# Allegro board electronic dice.brd
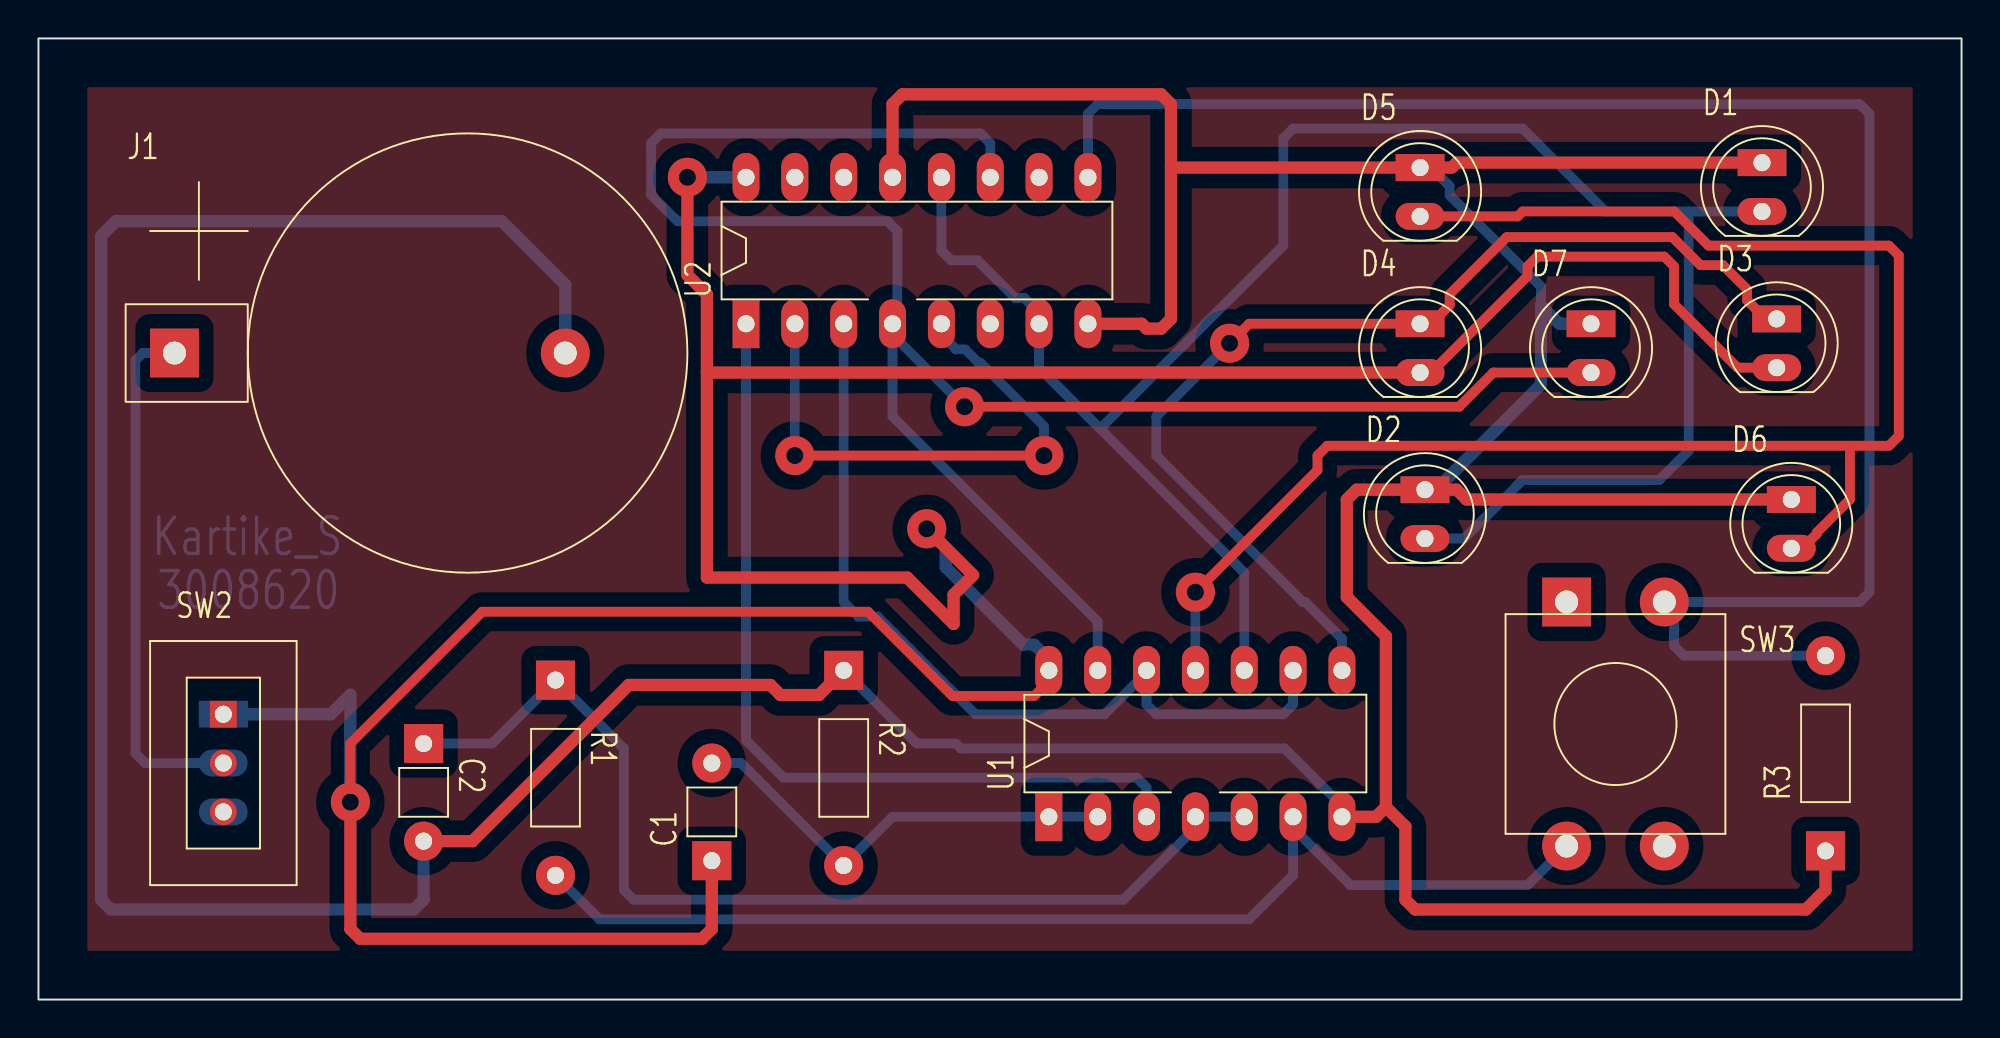
[diagram p0: board, top side]
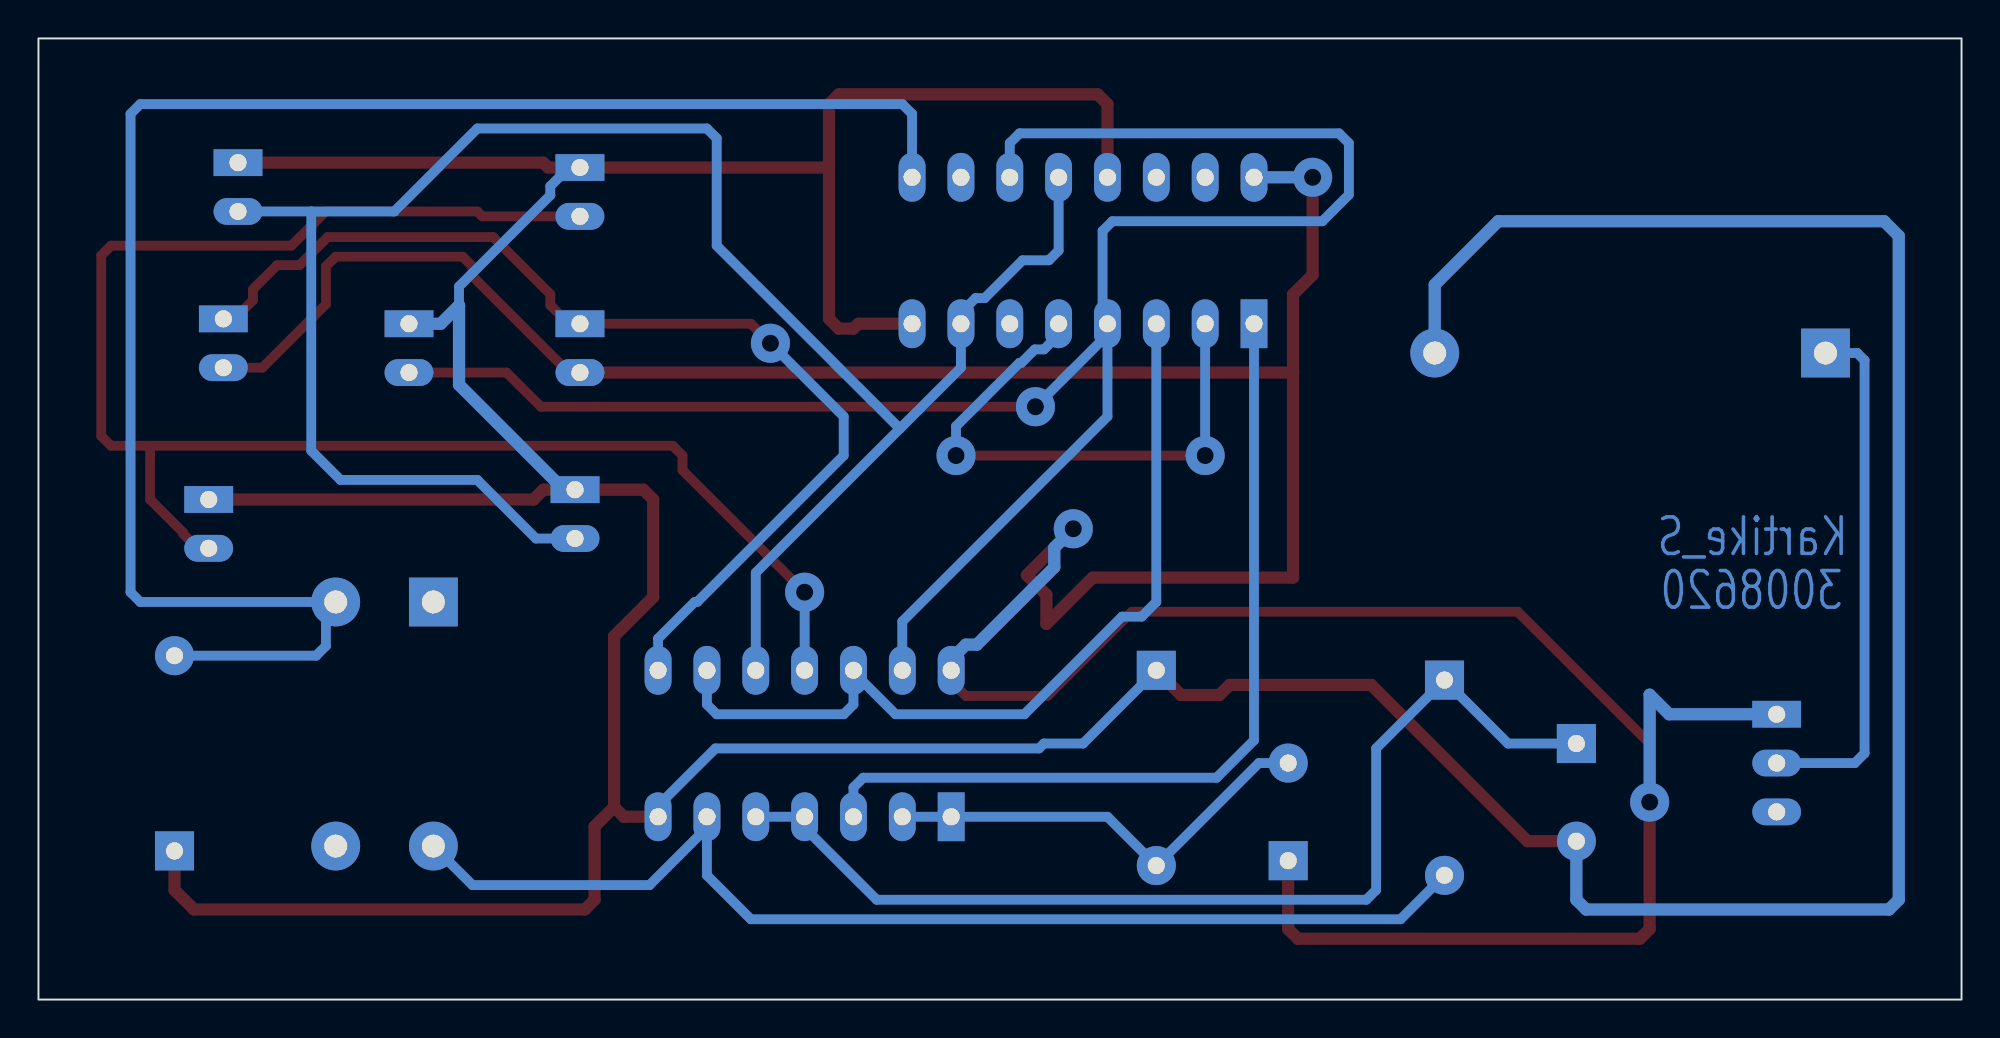
[diagram p1: board, bottom side, seen from below]

Outline 100 x 50.01 mm; copper layers: TOP, BOTTOM. Coordinates in mm from the lower left corner of the outline.
Outline path: rectangle 0,0 100,50.01

## Design rules (mm)
constraint set DEFAULT: min track width 0.508

## Placement (name value [footprint] x y rotation side)
C1  0.1u  [GU-RC200]  35.01 7.23 90 top
C2  1n  [GU-RC200]  20.03 13.32 270 top
D1  LED  [GU-LED5MM]  89.62 43.55 0 top
D2  LED  [GU-LED5MM]  72.1 26.53 0 top
D3  LED  [GU-LED5MM]  90.39 35.42 0 top
D4  LED  [GU-LED5MM]  71.84 35.17 0 top
D5  LED  [GU-LED5MM]  71.84 43.29 0 top
D6  LED  [GU-LED5MM]  91.15 26.02 0 top
D7  LED  [GU-LED5MM]  80.73 35.17 0 top
J1  Li_cell_holder  [GU-CR2032-CLIP]  7.07 33.64 0 top
R1  10k  [GU-RC400]  26.89 16.62 270 top
R2  10k  [GU-RC400]  41.87 17.13 270 top
R3  100k  [GU-RC400]  92.93 7.73 90 top
SW2  SW SLIDE-SPDT  [GU-SW-SLIDE-SPDT]  9.61 14.85 0 top
SW3  SW PUSHBUTTON-SPST-2/SM  [GU-PUSH52]  79.46 20.69 0 top
U1  74HC132  [GU-DIP14]  52.54 9.51 90 top
U2  74HC175  [GU-DIP16]  36.79 35.17 90 top

## Library data of the parts
C1 C2 = C
D1-D7 = LED
J1 = CON2
R1-R3 = R
SW2 = SW SLIDE-SPDT_0
SW3 = SW PUSHBUTTON-SPST-2/SM_0
U1 = 74HC132
U2 = 74HC175

## Footprints (pads in the part's own frame, mm; a bottom-side part is the same pattern mirrored in y, then rotated)
GU-CR2032-CLIP
  rect 2.54x2.54 hole 1.194: 1(0,0)
  round 2.54 hole 1.194: 2(20.32,0)
GU-DIP14
  rect 2.54x1.397 hole 0.889: 1(0,0)
  oval 2.54x1.397 hole 0.889: 2(0,-2.54) 3(0,-5.08) 4(0,-7.62) 5(0,-10.16) 6(0,-12.7) 7(0,-15.24) 8(7.62,-15.24) 9(7.62,-12.7) 10(7.62,-10.16) 11(7.62,-7.62) 12(7.62,-5.08) 13(7.62,-2.54) 14(7.62,0)
GU-DIP16
  rect 2.54x1.397 hole 0.889: 1(0,0)
  oval 2.54x1.397 hole 0.889: 2(0,-2.54) 3(0,-5.08) 4(0,-7.62) 5(0,-10.16) 6(0,-12.7) 7(0,-15.24) 8(0,-17.78) 9(7.62,-17.78) 10(7.62,-15.24) 11(7.62,-12.7) 12(7.62,-10.16) 13(7.62,-7.62) 14(7.62,-5.08) 15(7.62,-2.54) 16(7.62,0)
GU-LED5MM
  rect 2.54x1.397 hole 0.889: 1(0,0)
  oval 2.54x1.397 hole 0.889: 2(0,-2.54)
GU-PUSH52
  rect 2.54x2.54 hole 1.194: 1(0,0)
  round 2.54 hole 1.194: 2(5.08,0) 3(0,-12.7) 4(5.08,-12.7)
GU-RC200
  rect 2.032x2.032 hole 0.889: 1(0,0)
  round 2.032 hole 0.889: 2(5.08,0)
GU-RC400
  rect 2.032x2.032 hole 0.889: 1(0,0)
  round 2.032 hole 0.889: 2(10.16,0)
GU-SW-SLIDE-SPDT
  rect 1.397x1.397 hole 0.889: 1(0,0)
  round 1.397 hole 0.889: 2(0,-2.54) 3(0,-5.08)

## Nets
GND: C2.2 D1.1(CATHODE) D2.1(CATHODE) D5.1(CATHODE) D6.1(CATHODE) D7.1(CATHODE) J1.2 R2.1 R3.1 U1.7 U2.8 U2.13
VCC: C1.1 D3.2 D4.2 SW2.1 U1.14 U2.16
N00995: J1.1 SW2.2
N01027: C2.1 R1.1 U1.4 U1.5
N01073: R1.2 SW3.3 U1.6
N01089: R3.2 SW3.2(4) U2.9
N01167: C1.2 R2.2 U1.1 U1.2
N01198: U1.3 U2.1
N01227: U2.2 U2.5
N01252: D3.1(CATHODE) D4.1(CATHODE) U1.8
N01293: U1.9 U1.12 U2.3
N01305: D1.2 D2.2 U1.10 U2.7 U2.12
N01382: D5.2 D6.2 U1.11(O)
N01465: D7.2 U1.13 U2.4 U2.11

Pads without a net: SW2 3; SW3 1 4; U2 6 10 14 15

## Via types
v1: diameter 2.032, hole 0.889, TOP to BOTTOM, 8 vias

## Routing (per net, layer and track width the routed paths; a pad name or vN(x,y) marks a point on that pad's centre or on a via; arc(x,y) is an arc through that point)
GND: length 303
  TOP w0.635: 58.89,43.29 58.89,35.42 58.38,34.91 57.62,34.91 57.37,35.17 U2.8 ; 58.89,43.29 58.89,46.6 58.38,47.1 44.92,47.1 44.41,46.6 U2.13 ; 58.89,43.29 D5.1 73.49,43.29 73.75,43.55 D1.1 ; C2.2 22.57,8.24 30.7,16.37 38.06,16.37 38.59,15.85 40.59,15.85 R2.1 ; D6.1 74.26,26.02 73.75,26.53 D2.1 68.54,26.53 68.03,26.02 68.03,20.94 70.07,18.91 70.07,10.02 ; 70.07,10.02 69.56,9.51 U1.7 ; 70.07,10.02 71.08,9 71.08,5.19 71.59,4.69 91.91,4.69 92.93,5.7 R3.1
  BOTTOM w0.508: U1.7 67.78,10.08 64.8,13.07 47.97,13.07 47.71,13.32 45.68,13.32 R2.1 ; D5.1 72.42,43.29 73.38,42.33 73.38,41.85 78.13,37.1 78.13,36.12
  BOTTOM w0.635: C2.2 20.03,5.19 19.52,4.69 3.77,4.69 3.26,5.19 3.26,39.74 4.03,40.5 24.09,40.5 27.39,37.2 J1.2 ; D7.1 79.08,35.17 78.13,36.12 78.13,31.99 72.67,26.53 D2.1
VCC: length 203.7
  TOP w0.508: D4.2 72.42,32.63 77.43,37.64 77.43,38.15 77.94,38.66 84.54,38.66 85.05,38.15 85.05,36.18 88.35,32.88 D3.2 ; U1.14 52.54,16.56 51.78,15.8 47.52,15.8 43.14,20.18 23.08,20.18 16.22,13.32 v1(16.22,10.27)
  TOP w0.635: 34.76,32.63 34.76,21.96 45.17,21.96 47.59,19.55 47.59,21.07 48.6,22.09 v1(46.19,24.5) ; 34.76,32.63 34.76,36.69 33.74,37.71 v1(33.74,42.79) ; 34.76,32.63 D4.2 ; v1(16.22,10.27) 16.22,3.67 16.73,3.16 34.51,3.16 35.01,3.67 C1.1
  BOTTOM w0.635: U2.16 v1(33.74,42.79) ; v1(46.19,24.5) 47.18,23.51 47.18,22.49 51.2,18.47 51.78,18.47 52.54,17.7 U1.14 ; SW2.1 15.2,14.85 16.22,15.86 v1(16.22,10.27)
N00995: length 27.4
  BOTTOM w0.508: SW2.2 5.55,12.31 5.04,12.81 5.04,33.26 5.42,33.64 J1.1
N01027: length 55.2
  BOTTOM w0.508: C2.1 23.58,13.32 R1.1 30.44,13.07 30.44,5.7 30.95,5.19 56.41,5.19 60.16,8.94 U1.4 U1.5
N01073: length 59.6
  BOTTOM w0.508: R1.2 29.17,4.18 62.95,4.18 65.24,6.46 65.24,8.94 ; 65.24,8.94 68.22,5.96 77.43,5.96 SW3.3 ; 65.24,8.94 U1.6
N01089: length 90.7
  BOTTOM w0.508: R3.2 85.56,17.89 85.05,18.4 85.05,20.18 SW3.2 94.7,20.69 95.21,21.2 95.21,46.09 94.7,46.6 55.08,46.6 54.57,46.09 U2.9
N01167: length 23.3
  BOTTOM w0.508: C1.2 36.54,12.31 R2.2 44.41,9.51 U1.1 U1.2
N01198: length 45
  BOTTOM w0.508: U2.1 36.79,13.49 38.74,11.54 57.11,11.54 57.62,11.04 U1.3
N01227: length 29.2
  TOP w0.508: v1(39.33,28.31) v1(52.29,28.31)
  BOTTOM w0.508: v1(52.29,28.31) 52.29,29.83 48.98,33.13 48.89,33.13 48.19,33.83 47.72,33.83 46.95,34.59 U2.5 ; U2.2 v1(39.33,28.31)
N01252: length 55.8
  TOP w0.508: v1(61.94,34.15) 62.95,35.17 D4.1 72.42,35.17 73.38,36.13 73.38,36.71 76.35,39.67 84.96,39.67 86.43,38.21 87.59,38.21 88.85,36.96 88.85,36.39 89.81,35.42 D3.1
  BOTTOM w0.508: U1.8 67.78,18.78 65.87,20.69 65.75,20.69 58.13,28.31 58.13,30.34 v1(61.94,34.15)
N01293: length 45.1
  BOTTOM w0.508: 57.62,17.04 U1.12 ; 57.62,17.04 55.43,14.85 48.73,14.85 43.65,19.93 42.63,19.93 41.87,20.69 U2.3 ; 57.62,17.04 57.62,15.35 58.13,14.85 64.73,14.85 65.24,15.35 U1.9
N01305: length 107.3
  BOTTOM w0.508: D2.2 74.13,23.99 77.18,27.04 84.29,27.04 85.81,28.56 85.81,41.01 ; 85.81,41.01 81.5,41.01 77.18,45.33 65.24,45.33 64.73,44.82 64.73,39.23 55.21,29.71 ; 85.81,41.01 D1.2 ; 55.21,29.71 62.7,22.21 U1.10 ; 55.21,29.71 52.03,32.88 U2.7 52.03,35.74 51.27,36.5 50.79,36.5 48.83,38.47 47.46,38.47 46.95,38.98 U2.12
N01382: length 86.7
  TOP w0.508: 94.2,28.82 67.02,28.82 66.51,28.31 66.51,27.55 v1(60.16,21.2) ; 94.2,28.82 94.2,26.02 92.48,24.31 92.48,24.25 91.72,23.48 D6.2 ; 94.2,28.82 96.23,28.82 96.74,29.32 96.74,38.72 96.23,39.23 86.85,39.23 85.07,41.01 77.18,41.01 76.92,40.75 D5.2
  BOTTOM w0.508: U1.11 v1(60.16,21.2)
N01465: length 102.1
  TOP w0.508: v1(48.16,30.85) 73.88,30.85 75.65,32.63 D7.2
  BOTTOM w0.508: U2.11 49.49,44.56 48.98,45.07 32.37,45.07 31.86,44.56 31.86,41.88 33.24,40.5 44.16,40.5 44.67,39.99 44.67,35.42 U2.4 44.41,34.59 ; U1.13 55.08,19.67 44.41,30.34 44.41,34.59 ; 44.41,34.59 v1(48.16,30.85)

## Copper pours and planes (outline as drawn; the poured copper is in the pictures)
Net_1 on TOP: 2.54,47.47 97.46,47.47 97.46,2.54 2.54,2.54

## Text on the board
BOTTOM: Kartike_S | 3008620
